# Altium PCB 0.PCB1.PcbDoc (part 3 of 12)
Units mm, origin at the board's own origin, x right, y up, seen from the top; angles counter-clockwise.
Board outline 77 x 72 mm, 6 copper layers (Top Layer, Layer 1, Layer 3, Layer 4, Layer 2, Bottom Layer), stack 1.538 mm thick; 570 components, 490 nets, 3331 pads, 1909 vias.
Unrouted connection lines stored in the file: 2.
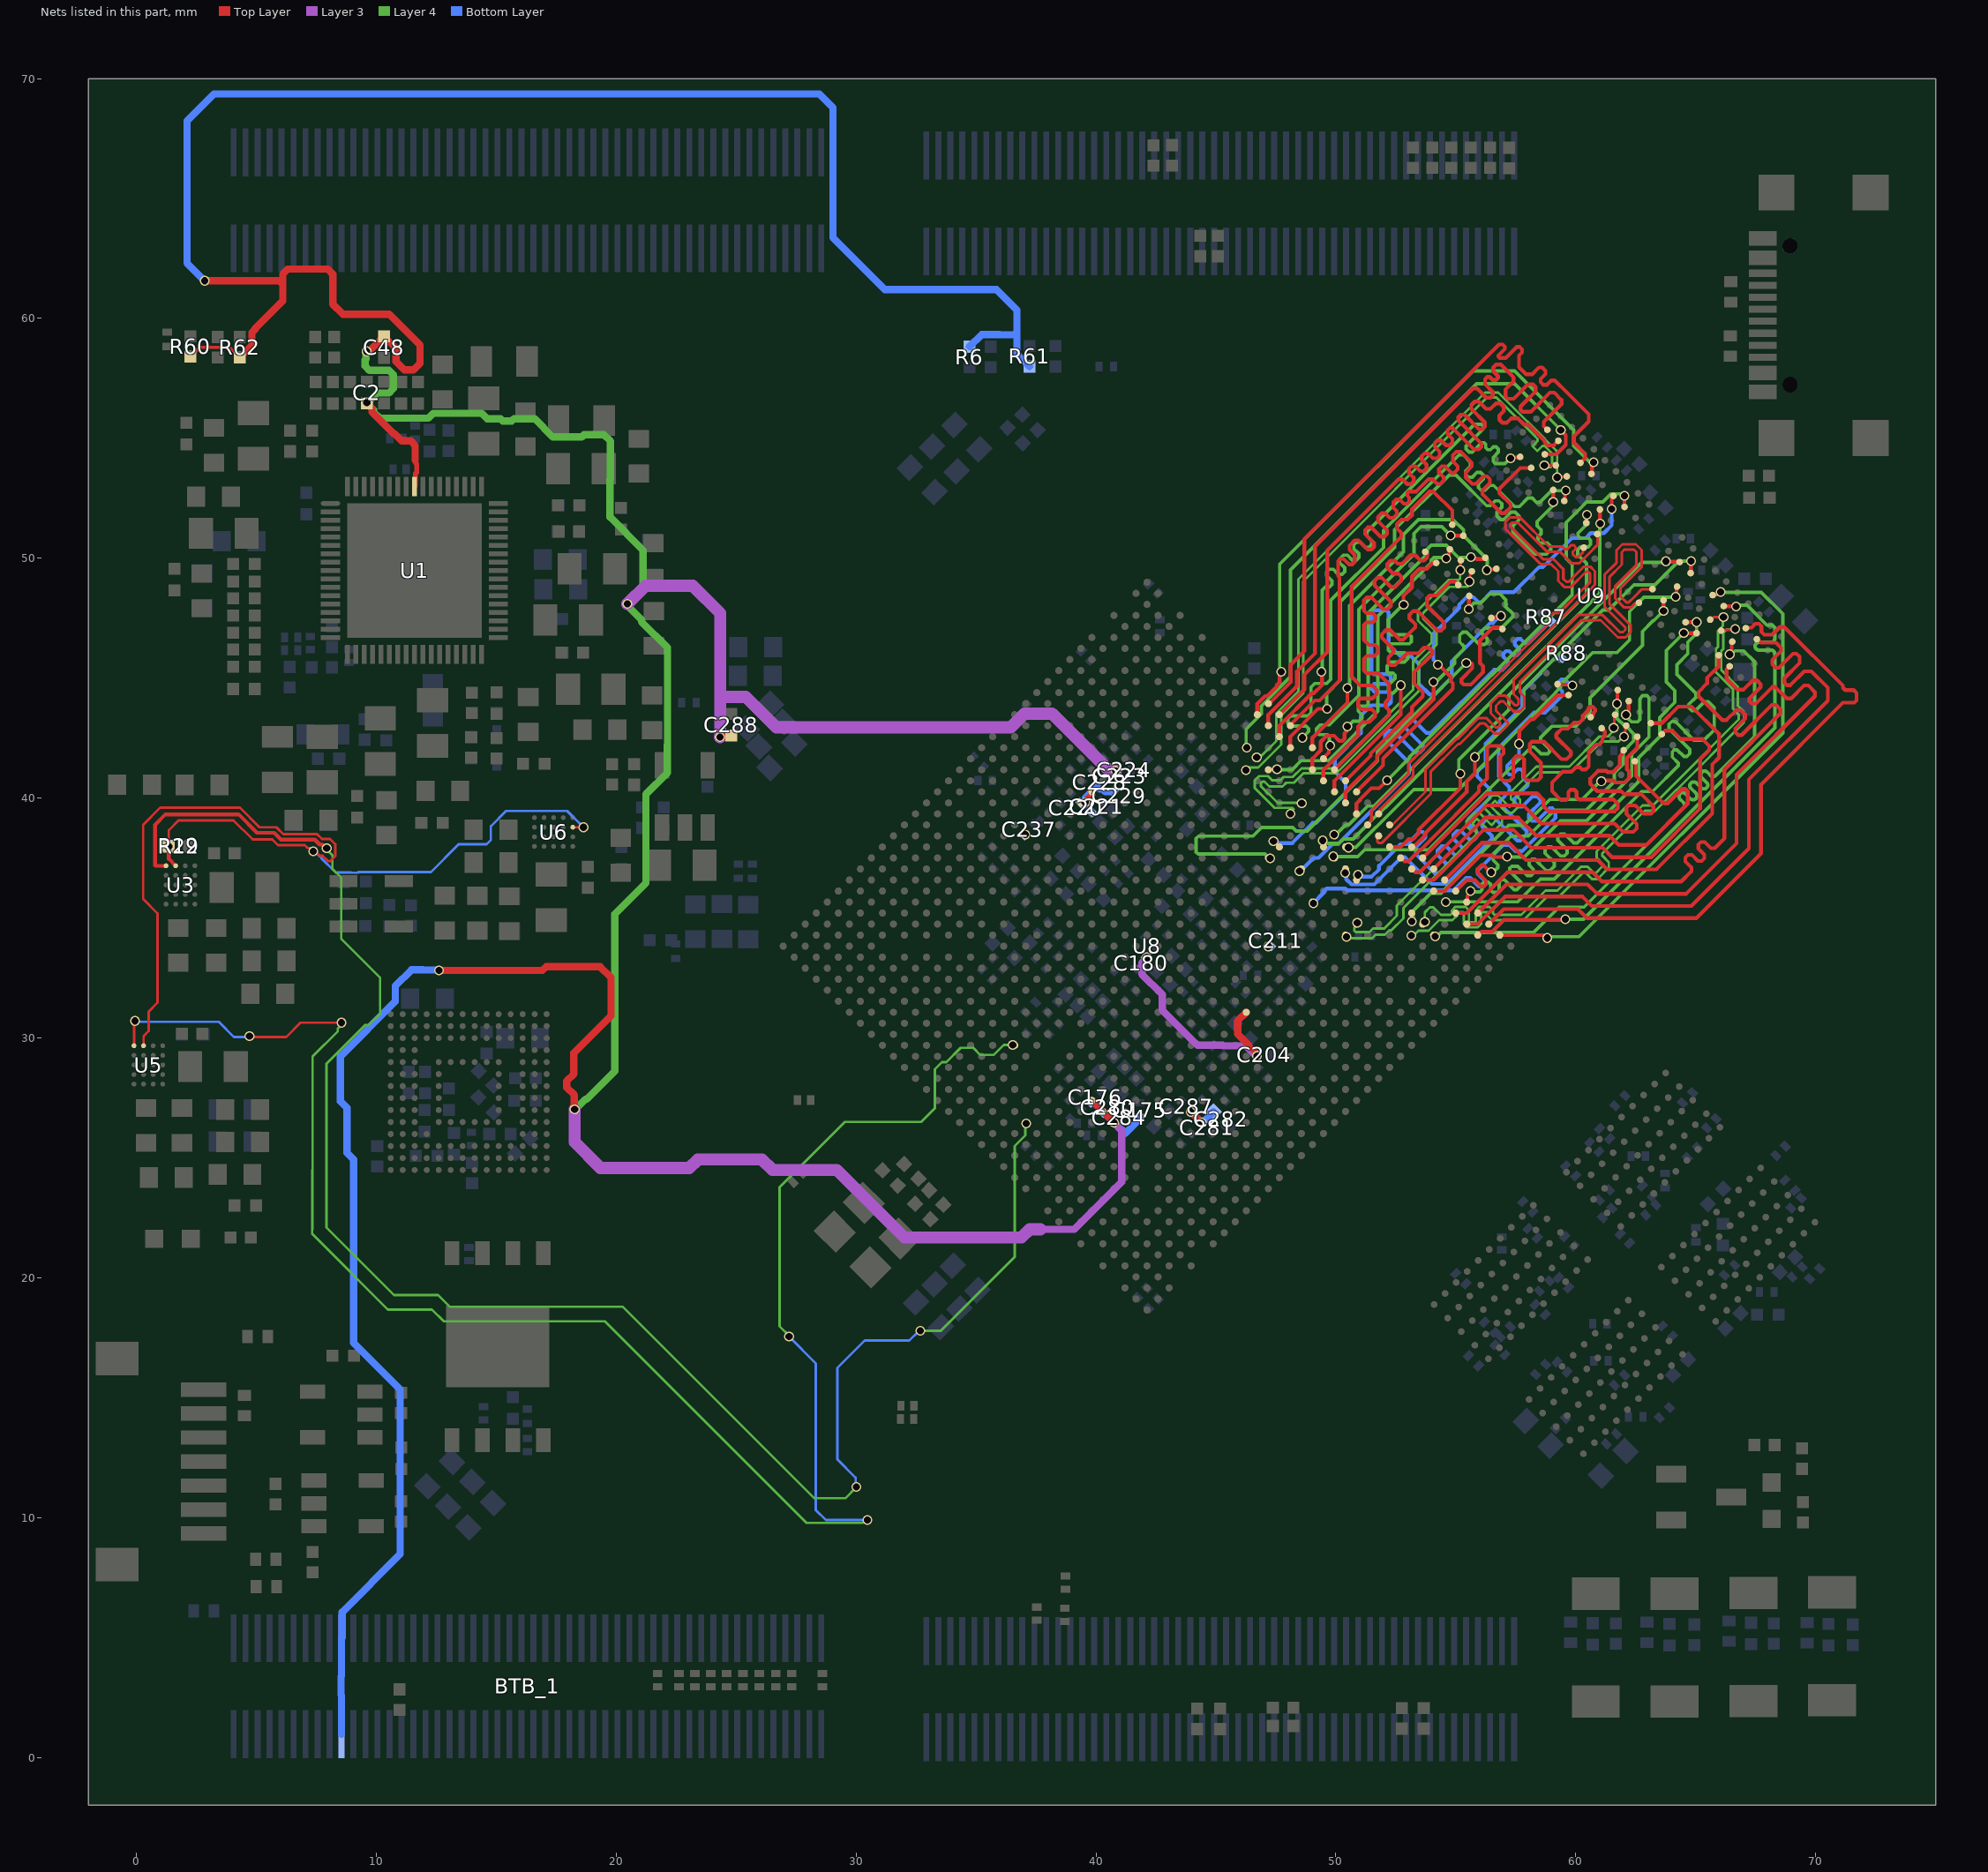
[diagram p7: the nets of this part, all layers, seen from the top]

## Via types
v1: diameter 0.41, hole 0.3, Top Layer to Bottom Layer, tented both sides, 1901 vias
v2: diameter 0.41, hole 0.3, Top Layer to Bottom Layer, 8 vias

## Nets (pads, with @x,y where several pads share a name; then routed paths per layer and width w, separated by ;. In a path a pad name is that pad's centre, name@x,y a point inside that pad or via, vN(x,y) a via of type N, cw(c..) or ccw(c..) an arc to the next point about the centre after c; other vN are vias at no path point) (continued)
AVDD1V8_DDR_PLL_S0: BTB_1.10 BTB_1.91 C2.2 C48.1 C175.2 C176.2 C180.2 C204.2 C211.2 C220.2 C221.2 C223.2 C224.2 C228.2 C229.2 C237.2 C280.2 C281.2 C282.2 C284.2 C287.2 C288.2 R6.2 R60.2 R61.2 R62.2 U1.60 U8.AG11 U8.AG13 U8.AG14 U8.AH18 U8.G23 U8.H23 U8.K16 U8.L27 U8.M12 U8.M27 U8.N27 U8.U18 | length 253.3
  Top Layer w0.127: R60.2@2.255,58.399 2.645,58.789 3.756,58.789 3.786,58.758 3.928,58.758 R62.2@4.312,58.374
  Top Layer w0.203: U1.60@11.59,52.989 11.637,53.036 11.637,53.523 11.681,53.567 11.681,53.933 11.624,53.99 11.624,54.086
  Top Layer w0.254: 46.382,29.671 46.635,29.418 46.635,29.367 46.713,29.29 v1(46.713,29.247)
  Top Layer w0.305: v1(2.849,61.567) 5.958,61.567 6.006,61.519 ; R62.2@4.312,58.374 4.353,58.333 4.353,58.414 4.625,58.687 4.635,58.687 4.816,58.869 4.816,59.407 4.951,59.542 4.951,59.579 6.1,60.728 6.1,61.857 6.298,62.055 7.98,62.055 8.191,61.844 8.191,60.592 8.607,60.175 10.538,60.175 11.82,58.894 11.82,58.121 11.551,57.852 11.171,57.852 10.824,58.198 10.824,58.742 10.341,59.226 C48.1@10.299,59.226 ; v1(9.595,58.628) 9.616,58.648 9.722,58.648 C48.1@10.32,59.246 ; C2.2@9.609,56.455 9.816,56.248 9.816,56.1 10.717,55.2 10.754,55.2 11.059,54.895 11.429,54.895 11.624,54.7 11.624,54.086 ; v1@12.636,32.813 16.924,32.813 17.081,32.97 19.334,32.97 19.788,32.515 19.788,30.922 18.236,29.37 18.236,28.499 17.937,28.199 17.937,27.936 18.252,27.62 18.252,27.041 v1(18.272,27.021) ; v1(24.329,42.542) 24.349,42.562 24.751,42.562 C288.2@24.792,42.603 ; v1(39.547,39.82) 39.547,39.848 39.832,40.133 U8.AG13@39.832,40.26 ; U8.N27@39.832,27.391 40.289,26.935 40.289,26.927 v1(40.748,26.467) ; v1(43.959,26.92) v1(44.418,26.46) ; U8.K16@46.267,31.068 45.912,30.713 45.912,30.165 46.382,29.695
  Layer 3 w0.305: 37.691,22.017 39.105,22.017 41.074,23.986 41.074,26.142 40.764,26.452 v1@40.764,26.457 ; v1(42.125,33.355) 42.125,33.326 41.919,33.12 41.919,32.655 42.763,31.811 42.763,31.158 44.174,29.746 44.186,29.746 44.239,29.693 45.277,29.693 45.299,29.671 46.261,29.671 46.684,29.247 v1(46.713,29.247)
  Layer 3 w0.508: v1(18.272,27.021) 18.272,25.649 19.349,24.572 23.045,24.572 23.403,24.93 26.083,24.93 26.519,24.494 29.195,24.494 32.012,21.677 36.895,21.677 37.234,22.017 37.691,22.017 ; v1(20.471,48.093) 21.23,48.852 23.192,48.852 24.34,47.704 24.34,44.222 ; v1(24.329,42.542) 24.34,42.553 24.34,44.222 ; v1(40.829,41.122) 40.572,41.122 38.173,43.521 37.015,43.521 36.446,42.952 26.675,42.952 25.405,44.222 24.34,44.222
  Layer 4 w0.305: v1(9.595,58.628) 9.575,58.608 9.575,58.304 9.537,58.266 9.537,58.013 9.716,57.835 10.53,57.835 10.708,57.656 10.708,57.07 10.53,56.891 10.04,56.891 9.638,56.489 v1(9.609,56.489) 9.609,56.46 9.882,56.187 9.882,56.106 10.151,55.837 12.168,55.837 12.374,56.043 14.39,56.043 14.62,55.814 15.175,55.814 15.268,55.721 15.648,55.721 15.741,55.814 16.607,55.814 17.363,55.058 18.565,55.058 18.652,55.146 19.493,55.146 19.762,54.877 19.762,53.305 19.742,53.284 19.742,51.712 21.117,50.337 21.117,48.739 v1@20.505,48.127 ; v1(18.272,27.021) 18.301,27.021 18.721,27.441 18.774,27.441 19.947,28.613 19.947,35.165 21.24,36.458 21.24,40.161 22.132,41.054 22.132,42.212 22.138,42.218 22.138,46.275 21.061,47.352 21.061,47.428 v1@20.434,48.055
  Bottom Layer w0.305: v1(2.849,61.567) 2.115,62.301 2.115,68.24 3.23,69.355 28.475,69.355 29.042,68.788 29.042,63.36 31.203,61.199 35.859,61.199 36.71,60.348 36.71,59.426 ; BTB_1.91@8.551,0.97 8.551,2.59 8.534,2.606 8.534,3.379 8.551,3.396 BTB_1.10@8.551,4.97 8.578,4.997 8.578,6.059 10.995,8.476 10.995,15.35 9.052,17.293 9.052,24.933 8.78,25.205 8.78,27.083 8.508,27.355 8.508,29.233 10.794,31.519 10.794,32.167 11.467,32.84 11.943,32.84 11.95,32.833 12.588,32.833 v1(12.608,32.813) ; R6.2@34.73,58.82 35.234,59.324 35.97,59.324 35.976,59.317 36.601,59.317 36.71,59.426 ; R61.2@37.231,57.993 36.885,58.339 36.875,58.339 36.71,58.504 36.71,59.426 ; C221.2@39.813,39.435 39.813,39.438 39.567,39.684 39.567,39.8 v1(39.547,39.82) 39.567,39.84 39.567,40.011 39.971,40.416 C228.2@39.971,40.419 ; C176.2@39.829,27.386 v1(40.748,26.467) ; C228.2@39.94,40.451 C228.2@39.971,40.419 ; C229.2@40.752,40.291 40.72,40.259 40.394,40.259 40.268,40.386 40.162,40.386 40.129,40.419 C228.2@39.971,40.419 ; C284.2@40.827,26.421 41.208,26.04 41.208,26.007 41.673,26.472 41.673,26.583 41.783,26.693 C175.2@41.828,26.693 ; v1(43.959,26.92) 43.963,26.924 43.965,26.924 44.422,26.467 C281.2@44.422,26.464 ; v1(44.418,26.46) C281.2@44.422,26.464 ; C282.2@44.901,26.922 44.472,26.492 44.45,26.492 C281.2@44.422,26.464
  other v1: 47.182,33.817 37.061,38.482
BIG/NPU_EN: R19.1 R22.2 U3.A2 U5.A2 U6.A2 | length 42.6
  Top Layer w0.102: U5.A2@0.299,29.671 0.299,30.079 0.489,30.27 0.508,30.288 0.508,31.093 0.884,31.469 0.884,31.51 0.884,35.192 0.284,35.792 0.284,38.885 0.998,39.599 4.317,39.599 5.136,38.78 5.838,38.78 6.121,38.497 7.53,38.497 7.733,38.294 8.076,38.294 8.291,38.079 8.291,37.583 8.076,37.367 7.992,37.367 7.764,37.595 7.645,37.595 7.459,37.781 7.459,37.868 v1(7.374,37.783) ; v1(1.353,37.982) 1.353,38.669 1.755,39.071 4.05,39.071 4.847,38.274 5.668,38.274 5.906,38.036 7.016,38.036 7.136,37.916 7.453,37.916 v1@7.48,37.889 ; U6.A2@18.193,38.784 v1(18.638,38.784)
  Top Layer w0.156: v1(1.353,37.982) 1.353,37.461 U3.A2@1.637,37.176
  Bottom Layer w0.102: v1(7.374,37.783) 7.438,37.783 7.659,37.562 7.714,37.562 7.714,37.49 8.311,36.893 8.947,36.893 8.948,36.891 9.233,36.891 9.26,36.918 12.277,36.918 13.431,38.072 14.599,38.072 14.777,38.25 14.777,38.834 15.405,39.463 17.959,39.463 18.469,38.953 v1(18.638,38.784)
CPU_BIG0_VSEL: U3.A1 U8.R31 | length 75.2
  Top Layer w0.156: U3.A1@1.237,37.176 0.799,37.176 0.78,37.195 0.78,38.884 1.215,39.319 4.259,39.319 5.029,38.55 5.742,38.55 6.025,38.267 7.434,38.267 7.637,38.063 7.732,38.063 7.886,37.91 v1(7.934,37.91)
  Layer 4 w0.102: v1(7.934,37.91) 7.934,37.847 8.173,37.608 8.173,37.044 8.544,36.673 8.544,34.126 10.162,32.508 10.162,31.02 9.674,30.532 9.534,30.532 7.926,28.923 7.926,22.091 10.736,19.28 12.576,19.28 13.062,18.794 20.271,18.794 28.262,10.804 29.557,10.804 30.019,11.266 v1(30.019,11.271) ; v1(32.682,17.79) 33.535,17.79 36.612,20.867 36.612,25.493 37.056,25.936 37.056,26.073 ; 37.056,26.073 37.056,26.388 v1(37.098,26.43)
  Bottom Layer w0.102: v1(30.019,11.271) 29.983,11.306 29.983,11.665 29.222,12.426 29.222,16.236 30.364,17.378 32.223,17.378 32.623,17.778 v1@32.707,17.778
CPU_BIG1_VSEL: U5.A1 U8.W28 | length 77.5
  Top Layer w0.102: U5.A1@-0.096,29.704 -0.098,29.707 -0.098,30.665 v1(-0.057,30.706) ; v1(4.717,30.07) 4.752,30.036 6.245,30.036 6.842,30.632 v1(8.549,30.632)
  Layer 4 w0.102: v1(8.549,30.632) 8.549,30.549 8.395,30.395 8.395,30.281 7.346,29.232 7.346,24.509 7.335,24.498 7.335,22.008 7.325,21.998 7.325,21.83 10.484,18.671 12.323,18.671 12.81,18.184 19.527,18.184 27.934,9.777 30.274,9.777 30.391,9.894 v1(30.475,9.894) ; v1(27.21,17.545) 27.21,17.579 26.812,17.977 26.812,23.772 29.537,26.498 32.72,26.498 33.288,27.066 33.288,28.693 33.585,28.989 33.766,28.989 34.362,29.585 34.889,29.585 35.187,29.288 35.733,29.288 36.153,29.708 36.523,29.708 v1(36.531,29.7)
  Bottom Layer w0.102: v1(-0.057,30.706) -0.021,30.671 3.431,30.671 4.066,30.036 4.683,30.036 v1(4.717,30.07) ; v1(27.21,17.545) 28.325,16.429 28.325,10.31 28.742,9.894 v1(30.475,9.894)
DDR_CH0_A0_A: U8.T7 U9.H2 | length 25.7
  Top Layer w0.156: v1@47.403,38.205 47.646,37.963 U8.T7@47.646,37.962 ; U9.H2@56.484,47.509 56.508,47.532 56.669,47.532 56.696,47.56 56.85,47.56 v1(56.885,47.594)
  Bottom Layer w0.156: v1(47.403,38.207) 47.487,38.123 48.19,38.123 49.029,38.962 49.179,38.962 50.412,40.195 50.412,40.638 49.963,41.087 49.963,41.625 51.04,42.703 51.04,43.422 51.489,43.871 52.175,43.871 52.293,43.988 52.293,44.326 52.201,44.417 51.617,44.417 51.508,44.527 51.508,44.663 51.6,44.755 52.156,44.755 52.293,44.892 52.293,45.07 52.201,45.162 51.581,45.162 51.489,45.253 51.489,47.737 51.581,47.829 52.112,47.829 52.204,47.737 52.204,46.404 52.676,45.931 52.887,45.931 ; 52.887,45.927 53.125,45.927 53.465,45.587 53.465,44.769 53.914,44.32 54.13,44.32 54.83,45.02 54.83,45.685 56.447,47.302 56.558,47.302 56.85,47.594 v1(56.885,47.594)
DDR_CH0_A0_B: U8.M8 U9.R2 | length 24
  Top Layer w0.156: v1(57.641,42.256) 57.65,42.266 57.65,42.806 58.13,43.285 58.24,43.285 59.246,44.291 U9.R2@59.701,44.291
  Bottom Layer w0.156: v1(49.061,35.61) 49.061,35.619 49.482,36.04 49.482,36.111 49.503,36.111 49.616,36.224 50.387,36.224 50.463,36.148 54.902,36.148 55.427,36.673 55.607,36.673 55.975,36.304 56.105,36.304 56.215,36.414 56.215,36.548 56.028,36.735 ; 56.024,36.731 55.909,36.846 55.909,36.976 56.967,38.033 57.239,38.033 57.487,37.785 57.766,37.785 59.158,39.177 59.158,39.449 59.039,39.568 58.909,39.568 58.391,39.05 58.173,39.05 58.054,39.17 58.054,39.335 58.518,39.8 58.518,39.929 58.391,40.056 58.196,40.056 57.773,39.633 57.643,39.633 57.452,39.825 57.446,39.825 57.446,39.97 57.802,40.325 57.802,40.336 57.997,40.531 57.997,40.66 57.906,40.752 57.894,40.752 57.802,40.844 57.802,41.107 57.71,41.199 57.581,41.199 57.36,40.978 57.231,40.978 57.139,41.07 57.139,41.341 57.54,41.743 57.561,41.743 57.635,41.816 57.635,42.246 v1@57.65,42.261
DDR_CH0_A1_A: U8.T8 U9.J2 | length 23.3
  Top Layer w0.156: v1(55.44,45.628) 55.46,45.607 55.673,45.607 55.691,45.59 55.691,45.41 55.237,44.957 55.237,44.827 55.329,44.736 55.63,44.736 56.14,45.246 56.14,45.5 56.014,45.626 56.014,46.577 56.552,47.116 56.876,47.116 U9.J2@56.944,47.049
  Layer 4 w0.142: v1(47.26,37.489) 47.217,37.489 47.041,37.665 44.256,37.665 44.172,37.748 44.172,38.311 44.277,38.415 46.547,38.415 46.905,38.773 48.203,38.773 48.351,38.626 48.805,38.626 51.734,41.555 51.734,41.922 v1(55.44,45.628)
DDR_CH0_A1_B: U8.M5 U9.P2 | length 21.5
  Top Layer w0.156: U9.P2@59.242,44.751 59.265,44.727 59.83,44.727 v1(59.859,44.698)
  Bottom Layer w0.156: v1(50.392,36.875) 50.44,36.827 50.44,36.613 50.657,36.396 51.606,36.396 52.75,37.541 52.88,37.541 54.004,36.417 54.632,36.417 56.505,38.29 56.505,38.419 56.104,38.82 56.104,38.95 56.409,39.255 56.538,39.255 57.562,38.231 57.692,38.231 57.957,38.497 57.957,38.637 56.841,39.753 56.841,39.882 57.237,40.278 57.237,40.458 56.788,40.907 56.788,42.092 58.26,43.565 58.727,43.565 59.444,44.282 59.444,44.454 59.268,44.631 59.268,44.811 59.4,44.943 59.546,44.943 59.791,44.698 v1(59.859,44.698)
DDR_CH0_A2_A: U8.P4 U9.H9 | length 19.5
  Top Layer w0.156: U9.H9@60.444,51.468 60.456,51.481 60.456,51.799 v1(60.469,51.812)
  Layer 4 w0.142: v1(49.928,38.482) 50,38.482 50.404,38.885 50.543,38.885 51.32,39.662 51.586,39.662 60.451,48.527 60.451,49.782 60.091,50.142 ; 60.08,50.142 60.08,50.358 60.192,50.47 60.522,50.47 60.624,50.572 60.624,50.747 60.541,50.831 60.202,50.831 60.091,50.942 60.091,51.04 60.424,51.373 60.424,51.767 v1(60.469,51.812)
DDR_CH0_A2_B: U8.N5 U9.R9 | length 20.3
  Top Layer w0.156: v1(63.662,47.801) U9.R9@63.661,48.251
  Layer 4 w0.142: v1(49.901,37.565) 50.917,37.565 51.195,37.844 53.862,37.844 54.119,38.1 58.148,42.13 58.266,42.13 58.556,41.839 58.828,41.839 58.911,41.923 58.911,42.041 58.544,42.408 58.544,42.526 58.983,42.965 59.012,42.994 60.008,42.994 60.599,43.584 60.599,44.179 62.785,46.366 62.785,46.947 63.235,47.396 63.256,47.396 v1(63.662,47.801)
DDR_CH0_A3_A: U8.P5 U9.H10 | length 19.4
  Top Layer w0.156: U9.H10@61.009,52.034 61.014,52.03 61.014,51.455 v1(61.018,51.451)
  Layer 4 w0.142: v1(49.45,38.23) 49.522,38.23 49.639,38.113 50.124,38.113 50.311,38.301 50.727,38.301 50.993,38.567 50.998,38.567 51.188,38.757 51.188,38.762 51.704,39.278 51.745,39.278 52.344,39.876 61.01,48.542 61.01,51.442 v1(61.018,51.451)
DDR_CH0_A3_B: U8.N4 U9.R10 | length 19.2
  Top Layer w0.156: v1(64.166,48.398) 64.203,48.435 64.203,48.793 U9.R10@64.227,48.817
  Layer 4 w0.142: v1(50.527,37.933) 50.537,37.943 50.834,37.943 52.555,39.664 53.252,40.361 55.122,40.361 58.897,44.136 59.373,44.612 59.373,44.732 60.705,46.064 61.723,46.064 62.247,46.587 62.247,47.774 62.841,48.368 64.136,48.368 v1(64.166,48.398)
DDR_CH0_A4_A: U8.R1 U9.H11 | length 19.4
  Top Layer w0.156: U8.R1@50.863,40.26 51.971,41.368 51.971,41.649 54.88,44.557 54.88,44.784 54.793,44.871 54.793,45.051 v1@54.326,45.518 ; v1(61.503,52.052) 61.503,52.494 61.575,52.566 U9.H11@61.575,52.6
  Bottom Layer w0.156: v1@54.325,45.515 54.073,45.766 54.073,46.854 54.583,47.364 54.69,47.471 55.147,47.927 55.147,48.062 55.455,48.37 55.744,48.37 55.941,48.173 56.07,48.173 56.483,48.586 57.421,48.586 58.463,49.628 58.635,49.628 59.847,50.84 60.412,50.84 60.624,51.052 61.177,51.052 61.503,51.377 v1(61.503,52.052)
  other v1: 54.259,45.555
DDR_CH0_A4_B: U8.K1 U9.R11 | length 18.3
  Top Layer w0.156: U8.K1@53.161,37.962 53.2,37.962 53.272,38.034 53.315,38.034 53.709,38.428 53.709,38.51 55.456,40.257 55.456,40.685 55.798,41.028 v1(55.798,41.705) ; U9.R11@64.793,49.382 64.804,49.394 64.804,49.872 v1(64.815,49.883)
  Layer 4 w0.142: v1(55.798,41.705) 57.849,43.756 57.849,44.544 61.138,47.834 61.373,47.834 62.43,48.89 63.299,48.89 64.292,49.883 v1(64.815,49.883)
DDR_CH0_A5_A: U8.P2 U9.J11 | length 19.6
  Top Layer w0.156: U8.P2@50.863,39.341 50.863,39.767 51.003,39.907 51.003,39.933 51.479,40.409 51.81,40.409 52.134,40.733 v1(52.134,40.745) ; U9.J11@62.035,52.14 v1(62.035,52.609)
  Layer 4 w0.142: v1(52.134,40.745) 52.146,40.745 53.083,41.682 53.083,41.709 59.856,48.483 59.856,49.733 59.6,49.989 59.6,51.49 60.22,52.11 60.222,52.11 60.454,52.342 61.129,52.342 61.475,52.688 61.873,52.688 61.952,52.609 v1(62.035,52.609)
DDR_CH0_A5_B: U8.L2 U9.P11 | length 18.3
  Top Layer w0.156: U8.L2@52.242,37.962 52.71,37.962 53.029,38.282 53.212,38.282 53.449,38.519 53.449,38.674 55.188,40.413 v1(55.188,41.019) ; v1(63.76,49.872) 63.775,49.857 64.318,49.857 U9.P11@64.333,49.842
  Layer 4 w0.142: v1(55.188,41.019) 55.13,41.078 55.13,41.599 57.218,43.687 57.218,44.293 57.436,44.511 62.753,49.828 63.716,49.828 v1(63.76,49.872)
DDR_CH0_CLKN_A: U8.N1 U9.J9 | length 24.1
  Top Layer w0.112: U8.N1@51.782,39.341 51.818,39.377 51.818,39.503 53.228,40.913 53.228,41.326 56.925,45.023 60.802,48.9 60.802,49.46 60.613,49.649 60.342,49.649 59.706,49.014 59.614,49.014 59.486,49.141 59.486,49.546 59.072,49.96 58.641,49.96 57.274,51.327 57.274,51.419 57.339,51.485 57.59,51.485 58.803,50.272 59.342,50.272 59.83,49.784 60.136,49.784 60.523,50.171 60.903,50.551 U9.J9@60.903,51.009
DDR_CH0_CLKN_B: U8.M1 U9.P9 | length 26
  Top Layer w0.112: U8.M1@52.242,38.881 52.278,38.917 52.397,38.917 53.741,40.262 53.741,41.192 55.013,42.465 55.074,42.465 55.947,43.338 56.273,43.338 56.662,42.949 56.755,42.949 56.839,43.033 56.839,43.157 56.463,43.533 56.463,43.95 56.79,44.276 57.062,44.276 57.467,43.871 57.561,43.871 57.627,43.937 57.627,44.115 57.413,44.328 57.413,44.928 60.116,47.63 61.127,47.63 61.836,46.922 61.975,46.922 62.069,47.016 62.069,47.115 61.201,47.983 61.201,49.313 61.707,49.82 61.707,50.339 61.945,50.577 62.511,50.577 62.749,50.339 62.749,49.632 61.869,48.752 61.869,48.403 62.116,48.156 62.209,48.156 62.439,48.387 62.763,48.711 U9.P9@63.202,48.711
DDR_CH0_CLKP_A: U8.N2 U9.J8 | length 24.6
  Top Layer w0.112: U8.N2@51.323,38.881 51.323,38.932 51.485,39.095 51.485,39.471 53.015,41.001 53.015,41.414 58.962,47.362 58.962,47.604 59.065,47.707 59.307,47.707 60.411,48.811 ; U9.J8@60.338,50.443 60.31,50.415 60.31,50.259 60.094,50.044 60.002,50.044 59.874,50.171 59.874,50.264 59.991,50.381 59.991,50.473 59.915,50.549 59.816,50.549 59.641,50.374 59.542,50.374 59.431,50.485 58.892,50.485 57.679,51.698 57.251,51.698 57.06,51.508 57.06,51.238 58.552,49.747 58.984,49.747 59.273,49.458 59.273,49.053 59.525,48.8 59.795,48.8 60.433,49.438 60.526,49.438 60.591,49.373 60.591,48.987 60.413,48.809
DDR_CH0_CLKP_B: U8.M2 U9.P8 | length 26.4
  Top Layer w0.112: U8.M2@51.729,38.339 51.727,38.337 51.727,38.183 51.787,38.123 51.904,38.123 53.954,40.173 53.954,41.104 55.102,42.252 55.162,42.252 56.03,43.119 56.19,43.119 56.616,42.693 56.819,42.693 57.175,43.049 57.175,43.142 56.679,43.638 56.679,43.848 56.859,44.028 56.996,44.028 57.404,43.62 57.674,43.62 57.864,43.81 57.864,44.218 57.667,44.416 57.667,44.846 60.228,47.407 60.769,47.407 60.778,47.417 61.039,47.417 61.757,46.698 62.074,46.698 62.285,46.909 62.285,47.216 62.018,47.483 ; 62.039,47.468 61.414,48.093 61.414,49.225 61.921,49.731 61.921,50.251 62.034,50.364 62.423,50.364 62.536,50.251 62.536,49.72 61.656,48.84 61.656,48.315 62.028,47.943 62.297,47.943 62.467,48.113 62.604,48.113 U9.P8@62.636,48.145
DDR_CH0_DM0_A: U8.Y4 U9.C3 | length 13.9
  Top Layer w0.156: U8.Y4@47.186,41.179 47.194,41.187 47.541,41.187 v1(47.549,41.195) ; v1(54.604,49.99) 54.604,50.069 54.728,50.194 54.728,50.349 U9.C3@54.752,50.372
  Layer 4 w0.142: v1(47.549,41.195) 47.565,41.178 48.179,41.178 48.559,41.559 49.683,41.559 49.904,41.779 51.75,43.625 51.75,47.586 53.984,49.819 53.984,49.92 54.094,50.03 54.563,50.03 v1(54.604,49.99)
DDR_CH0_DM0_B: U8.G4 U9.Y3 | length 14.1
  Top Layer w0.142: U8.G4@53.161,35.204 53.165,35.201 53.165,34.858 v1(53.168,34.855)
  Top Layer w0.156: v1(61.069,40.697) 61.101,40.729 61.572,40.729 61.65,40.651 62.031,40.651 62.231,40.851 62.231,41.1 62.138,41.192 62.138,41.674 62.565,42.101 U9.Y3@62.565,42.559
  Layer 4 w0.142: v1(53.168,34.855) 53.224,34.911 53.224,35.294 53.957,36.027 54.38,36.027 56.899,38.546 57.218,38.864 57.842,38.864 58.92,39.942 60.271,39.942 61.026,40.697 v1(61.069,40.697)
DDR_CH0_DM1_A: U8.AB4 U9.C10 | length 25.2
  Top Layer w0.156: U9.C10@58.711,54.332 59.193,54.332 59.589,54.728 59.589,55.135 59.379,55.344 v1(59.377,55.343)
  Layer 4 w0.142: v1(46.286,42.1) 46.265,42.122 46.265,42.881 46.89,43.507 46.89,43.839 47.988,44.937 48.117,45.066 48.117,49.52 55.871,57.274 57.451,57.274 59.337,55.388 59.373,55.388 59.377,55.384 v1(59.377,55.343)
DDR_CH0_DM1_B: U8.E4 U9.Y10 | length 24.2
  Top Layer w0.156: v1@66.503,46.144 66.503,46.497 U9.Y10@66.525,46.519
  Layer 4 w0.142: v1(54.147,34.224) 54.219,34.224 54.384,34.389 58.248,34.389 59.311,35.452 60.352,35.452 64.437,39.537 64.487,39.588 ccw(c64.374,39.701) 64.487,39.814 64.353,39.948 cw(c64.467,40.062) 64.353,40.175 cw(c64.467,40.062) 64.58,40.175 64.781,39.974 ccw(c64.894,40.087) 65.007,39.974 ccw(c64.894,40.087) 65.007,40.2 64.806,40.401 cw(c64.919,40.515) 64.806,40.628 cw(c64.919,40.515) 65.033,40.628 65.234,40.427 ccw(c65.347,40.54) 65.46,40.427 ccw(c65.347,40.54) 65.46,40.653 65.259,40.854 cw(c65.372,40.968) 65.259,41.081 cw(c65.372,40.968) 65.486,41.081 65.62,40.947 ccw(c65.733,41.06) 65.846,40.947 66.436,41.536 67.455,42.556 67.455,45.689 67.006,46.138 66.639,46.138 66.493,45.992 v1(66.42,45.992)
DDR_CH0_DQ0_A: U8.U1 U9.B2 | length 18
  Top Layer w0.156: U8.U1@49.944,41.179 52.224,43.459 52.224,43.668 52.071,43.821 52.071,44 52.224,44.153 52.224,44.744 51.769,45.2 51.297,45.2 51.17,45.327 51.17,45.804 51.297,45.931 51.627,45.931 51.772,46.076 51.772,46.256 51.645,46.383 51.387,46.383 51.17,46.6 51.17,47.218 51.281,47.329 51.538,47.329 51.649,47.441 51.649,47.599 51.538,47.711 51.281,47.711 51.17,47.822 51.17,48.24 51.297,48.367 51.476,48.367 51.971,47.872 52.151,47.872 52.293,48.014 52.293,48.194 51.612,48.875 51.612,49.055 51.739,49.182 51.919,49.182 52.296,48.805 52.476,48.805 52.726,49.055 52.726,49.234 52.598,49.361 52.386,49.361 52.152,49.595 52.152,49.775 52.278,49.9 52.458,49.9 52.586,49.772 52.766,49.772 53.125,50.131 53.304,50.131 53.535,49.9 53.678,49.9 53.805,50.027 53.805,50.188 U9.B2@53.726,50.266
DDR_CH0_DQ0_B: U8.H1 U9.AA2 | length 16.7
  Top Layer w0.156: U8.H1@54.08,37.043 56.22,39.183 57.607,39.183 58.359,38.431 61.412,38.431 61.802,38.041 62.942,38.041 64.676,39.775 64.676,40.269 64.562,40.382 64.433,40.382 63.826,39.776 63.696,39.776 63.644,39.828 ; U9.AA2@62.459,41.534 62.516,41.477 62.516,40.92 63.621,39.815 63.631,39.815
DDR_CH0_DQ1_A: U8.T2 U9.C2 | length 16.1
  Top Layer w0.156: U8.T2@49.944,40.26 49.944,40.718 52.709,43.483 v1@52.709,44.692 ; v1@52.817,48.104 52.817,48.427 53.176,48.787 53.176,49.249 53.486,49.559 53.793,49.559 54.017,49.783 54.162,49.783 U9.C2@54.186,49.807
  Layer 4 w0.142: 52.189,45.559 52.3,45.671 52.863,45.671 53.003,45.811 53.003,45.929 52.881,46.052 52.3,46.052 52.189,46.163 52.189,46.322 52.3,46.433 53.069,46.433 53.152,46.516 53.152,46.731 53.069,46.814 52.3,46.814 52.189,46.925 52.189,47.45 52.817,48.078 v1@52.817,48.114 ; 52.194,45.553 52.145,45.504 52.145,45.283 52.217,45.212 52.382,45.212 52.466,45.129 52.466,44.994 52.189,44.717 52.189,44.466 52.272,44.382 52.39,44.382 v1(52.709,44.701)
  other v1: 52.829,48.055
DDR_CH0_DQ1_B: U8.J2 U9.Y2 | length 19.1
  Top Layer w0.156: U8.J2@53.161,37.043 53.191,37.043 53.325,36.909 53.494,36.909 54.402,37.817 56.276,39.691 57.818,39.691 58.569,38.939 61.622,38.939 61.977,38.585 62.398,38.585 62.546,38.734 62.546,38.913 62.118,39.342 62.118,39.599 62.209,39.69 62.488,39.69 62.543,39.636 62.836,39.342 63.142,39.342 63.234,39.434 63.234,39.663 62.731,40.166 62.013,40.166 61.887,40.291 60.903,40.291 60.612,40.582 60.612,40.812 60.874,41.074 60.934,41.135 61.276,41.135 61.329,41.082 61.551,41.082 61.837,41.367 61.837,41.735 61.934,41.833 61.934,41.895 62,41.96 U9.Y2@61.999,41.993
DDR_CH0_DQ2_A: U8.T1 U9.E2 | length 18.5
  Top Layer w0.156: U8.T1@50.404,40.72 51.455,41.771 51.455,41.862 53.176,43.583 53.176,43.794 53.625,44.243 53.625,44.422 53.266,44.782 53.266,45.245 54.022,46.001 54.022,46.131 53.888,46.264 53.671,46.264 53.446,46.039 52.975,46.039 52.473,45.537 52.284,45.537 52.193,45.629 52.193,45.861 52.405,46.073 52.405,46.203 51.914,46.693 51.914,46.823 52.092,47.001 52.27,47.001 52.669,46.601 52.799,46.601 53.315,47.117 53.315,47.247 53.068,47.494 53.068,47.637 53.229,47.797 53.408,47.797 54.217,46.988 54.397,46.988 54.524,47.115 54.524,47.295 53.805,48.014 53.805,48.338 53.912,48.445 54.2,48.445 54.784,49.029 54.963,49.029 U9.E2@55.105,48.887
DDR_CH0_DQ2_B: U8.J1 U9.V2 | length 17.8
  Top Layer w0.156: U8.J1@53.621,37.502 56.317,40.199 58.387,40.199 58.654,39.932 58.654,39.665 58.871,39.448 61.631,39.448 61.758,39.575 61.758,39.754 61.571,39.942 60.129,39.942 60.037,40.033 60.037,40.252 59.946,40.343 59.786,40.343 59.694,40.252 59.694,40.011 59.603,39.919 59.386,39.919 59.013,40.291 59.013,40.651 59.462,41.1 59.821,41.1 60.001,41.279 60.181,41.279 60.271,41.189 60.413,41.189 60.54,41.317 60.54,41.921 60.848,42.229 60.99,42.229 61.117,42.356 61.117,42.498 61.216,42.597 61.216,42.777 U9.V2@61.08,42.912
DDR_CH0_DQ3_A: U8.R2 U9.F2 | length 16
  Top Layer w0.156: U8.R2@50.404,39.801 50.403,40.262 51.713,41.571 51.713,41.755 54.075,44.117 v1@54.075,44.835 ; v1(55.538,47.88) 55.551,47.894 55.551,48.415 U9.F2@55.565,48.428
  Layer 4 w0.142: v1(54.075,44.845) 54.182,44.845 54.951,45.614 54.951,45.823 55.34,46.212 55.34,46.331 55.166,46.505 55.166,46.785 55.308,46.927 55.455,46.927 55.978,46.404 56.215,46.404 56.309,46.498 56.309,46.647 56.091,46.865 56.091,46.974 56.211,47.094 56.253,47.094 ; v1(55.538,47.88) 55.538,47.902 55.768,48.132 56.039,48.132 56.416,48.509 56.841,48.509 57.092,48.258 57.092,47.97 57.374,47.688 57.374,47.564 56.901,47.09 56.88,47.09 ; 56.257,47.092 56.88,47.092
DDR_CH0_DQ3_B: U8.K2 U9.U2 | length 19.5
  Top Layer w0.156: U8.K2@52.702,37.502 52.732,37.502 52.865,37.369 53.035,37.369 53.489,37.822 53.516,37.822 53.957,38.263 55.964,40.27 55.964,40.475 56.306,40.817 56.306,42.084 56.398,42.176 56.858,42.176 56.992,42.042 56.992,41.862 56.858,41.728 56.858,40.85 56.985,40.723 57.252,40.723 57.397,40.868 57.397,41.62 57.523,41.746 57.719,41.746 57.846,41.619 57.846,40.868 57.973,40.74 58.419,40.74 58.546,40.868 58.546,41.477 58.092,41.931 58.092,42.256 58.183,42.347 58.682,42.347 59.408,41.62 59.624,41.62 59.803,41.799 59.803,41.927 59.193,42.536 59.193,42.662 59.426,42.896 59.683,42.896 59.932,43.145 60.164,43.145 60.291,43.272 60.291,43.444 60.305,43.444 60.536,43.675 60.536,43.749 60.591,43.804 60.709,43.804 60.809,43.703 60.809,43.631 60.737,43.559 60.737,43.488 U9.U2@60.621,43.372
DDR_CH0_DQ4_A: U8.W1 U9.F4 | length 15.9
  Top Layer w0.156: U8.W1@49.025,42.099 49.025,42.516 50.482,43.973 v1(50.482,44.584) ; v1(56.289,49.506) 56.318,49.536 56.673,49.536 U9.F4@56.696,49.559
  Layer 4 w0.142: v1@50.483,44.594 50.574,44.685 50.574,48.026 52.817,50.269 52.817,50.988 53.446,51.616 54.883,51.616 55.332,51.167 55.332,50.936 56.309,49.959 56.309,49.526 v1(56.289,49.506)
DDR_CH0_DQ4_B: U8.F1 U9.U4 | length 14.9
  Top Layer w0.156: U8.F1@55,36.123 55.45,36.574 55.798,36.574 56.052,36.32 56.172,36.32 56.255,36.403 56.255,36.548 55.9,36.904 55.9,37.031 56.077,37.209 56.154,37.209 56.408,36.955 v1@56.458,36.955 ; v1(61.724,43.932) 61.738,43.946 61.738,44.49 U9.U4@61.752,44.503
  Layer 4 w0.142: v1(56.484,36.904) 56.56,36.904 56.755,37.099 56.755,37.217 56.56,37.412 56.56,37.666 56.662,37.768 ; 56.661,37.769 57.308,38.415 58.026,38.415 59.104,39.493 60.427,39.493 61.615,40.681 61.615,41.057 61.977,41.42 61.977,41.936 62.426,42.385 62.426,42.674 62.104,42.996 62.051,42.996 61.727,43.32 61.727,43.929 v1(61.724,43.932)
DDR_CH0_DQ5_A: U8.V2 U9.E4 | length 15.1
  Top Layer w0.156: U8.V2@49.025,41.18 49.025,41.647 49.37,41.992 49.37,42.351 49.613,42.594 49.931,42.594 50.141,42.383 50.271,42.383 50.362,42.475 50.362,42.695 50.433,42.766 50.433,42.932 v1(50.489,42.988) ; v1(55.632,50.047) 55.68,49.998 55.823,49.998 55.862,49.96 56.144,49.96 56.203,50.019 U9.E4@56.237,50.019
  Layer 4 w0.142: v1@50.515,43.076 50.599,43.076 50.726,43.203 50.972,43.203 51.099,43.33 51.099,43.457 50.933,43.624 50.933,43.742 51.016,43.825 51.261,43.825 51.344,43.909 51.344,47.704 53.812,50.172 53.812,50.372 53.977,50.537 54.604,50.537 55.166,49.976 55.213,50.023 55.608,50.023 v1(55.632,50.047)
DDR_CH0_DQ5_B: U8.G2 U9.V4 | length 16.6
  Top Layer w0.156: U8.G2@54.08,36.124 54.535,36.124 56.027,37.615 56.508,37.615 56.584,37.539 57.128,37.539 v1(57.144,37.556) ; v1(62.097,43.47) 62.097,43.539 62.212,43.653 U9.V4@62.212,44.044
  Layer 4 w0.142: v1(57.144,37.556) 57.161,37.539 57.868,37.539 57.936,37.607 59.373,39.044 60.451,39.044 62.336,40.93 62.336,41.828 63.055,42.546 63.055,44.187 62.971,44.27 62.79,44.27 62.707,44.187 62.707,44.143 62.681,44.118 62.681,43.279 62.58,43.178 62.327,43.178 62.206,43.299 62.206,43.319 62.097,43.428 v1(62.097,43.47)
DDR_CH0_DQ6_A: U8.V1 U9.C4 | length 14.2
  Top Layer w0.156: U8.V1@49.484,41.639 49.484,41.678 49.708,41.902 49.708,42.131 v1(49.764,42.187) ; v1(54.789,50.947) 54.793,50.942 55.313,50.942 U9.C4@55.317,50.938
  Layer 4 w0.142: v1@49.746,42.205 v1(49.764,42.187) ; v1@49.778,42.238 49.727,42.289 49.727,42.569 49.651,42.644 49.296,42.644 49.194,42.746 49.194,42.898 49.346,43.051 49.73,43.051 50.186,43.507 50.952,44.273 50.955,44.276 50.955,47.868 53.266,50.18 53.266,51.032 53.547,51.312 54.423,51.312 v1(54.789,50.947)
DDR_CH0_DQ6_B: U8.G1 U9.Y4 | length 20.3
  Top Layer w0.156: U8.G1@54.54,36.583 56.093,38.136 57.217,38.136 57.938,37.415 60.92,37.415 61.31,37.025 63.362,37.025 65.692,39.355 65.692,41.402 65.976,41.686 65.976,42.668 ; U9.Y4@63.131,43.124 63.589,43.124 64.277,43.813 64.831,43.813 65.928,42.716 65.976,42.668 ; 65.933,42.721 65.976,42.677 65.976,42.668
DDR_CH0_DQ7_A: U8.U2 U9.B4 | length 18.5
  Top Layer w0.156: U8.U2@49.484,40.72 49.484,41.172 50.266,41.953 50.931,42.618 50.931,42.985 51.111,43.165 51.397,43.165 51.629,43.397 51.629,43.577 51.501,43.704 51.058,43.704 50.931,43.831 50.931,44.063 51.021,44.153 51.522,44.153 51.702,44.333 51.702,44.512 51.522,44.692 51.021,44.692 50.661,45.051 50.661,48.822 52.727,50.888 52.727,51.068 52.547,51.247 52.547,51.427 52.727,51.607 52.985,51.607 53.176,51.797 53.176,52.056 53.895,52.774 54.074,52.774 54.858,51.99 U9.B4@54.858,51.398
DDR_CH0_DQ7_B: U8.H2 U9.AA4 | length 18.8
  Top Layer w0.156: U8.H2@53.621,36.583 54.08,36.583 54.858,37.361 56.172,38.675 57.397,38.675 58.148,37.923 61.13,37.923 61.52,37.533 63.152,37.533 65.184,39.565 65.184,41.612 65.569,41.997 65.569,42.177 65.29,42.456 64.392,42.456 64.042,42.806 63.731,42.806 U9.AA4@63.59,42.665
DDR_CH0_DQ8_A: U8.AB2 U9.B11 | length 29.3
  Top Layer w0.156: U8.AB2@47.186,43.018 47.186,43.474 48.327,44.615 48.382,44.67 48.382,45.285 49.135,46.039 49.135,50.5 55.717,57.082 55.884,57.082 56.268,56.698 56.451,56.698 56.542,56.79 56.542,56.937 56.22,57.26 56.22,57.47 56.311,57.562 56.413,57.562 56.544,57.43 56.674,57.43 56.766,57.522 56.766,57.599 56.564,57.801 56.564,57.958 56.678,58.072 56.884,58.072 57.41,57.546 57.41,57.367 57.074,57.031 57.074,56.744 57.165,56.653 57.414,56.653 58.014,57.252 58.217,57.252 58.332,57.137 58.332,56.957 57.7,56.325 57.7,56.205 57.7,56.196 57.792,56.104 58.122,56.104 58.923,56.905 59.103,56.905 59.408,56.6 59.408,56.42 58.671,55.683 58.671,55.503 U9.B11@58.817,55.357
DDR_CH0_DQ8_B: U8.D2 U9.AA11 | length 28.7
  Top Layer w0.156: U8.D2@55.459,34.745 55.914,34.745 57.06,35.891 60.289,35.891 60.679,35.501 64.82,35.501 67.216,37.897 67.216,40.771 70.508,44.063 70.508,44.602 69.824,45.286 69.527,45.286 68.948,44.707 68.8,44.707 68.699,44.808 68.699,44.996 69.334,45.631 69.334,45.898 69.209,46.023 69.059,46.023 68.47,45.433 68.34,45.433 68.191,45.583 68.191,45.756 68.565,46.131 68.565,46.26 68.351,46.475 67.734,46.475 67.607,46.601 U9.AA11@67.537,46.601
DDR_CH0_DQ9_A: U8.AB1 U9.C11 | length 29.3
  Top Layer w0.156: U8.AB1@47.646,43.478 48.686,44.518 48.686,45.13 49.645,46.089 49.645,50.321 52.619,53.294 52.776,53.294 52.978,53.093 53.136,53.093 53.247,53.204 53.247,53.362 53.046,53.564 53.046,53.721 53.158,53.833 53.315,53.833 53.517,53.632 53.675,53.632 53.786,53.743 53.786,53.901 53.585,54.102 53.585,54.26 53.696,54.372 53.854,54.372 54.056,54.17 54.213,54.17 54.325,54.282 54.325,54.44 54.124,54.641 54.124,54.799 54.235,54.911 54.393,54.911 54.594,54.709 54.752,54.709 54.864,54.821 54.864,54.979 54.662,55.18 54.662,55.338 54.747,55.422 54.877,55.422 55.765,54.534 55.958,54.534 56.072,54.648 56.072,54.778 55.181,55.67 ; 55.178,55.672 55.112,55.738 55.112,55.893 55.204,55.984 55.369,55.984 55.968,55.385 56.109,55.385 56.211,55.487 56.211,55.666 55.656,56.221 55.656,56.401 55.783,56.528 55.962,56.528 56.267,56.224 56.446,56.224 56.678,56.456 56.858,56.456 57.002,56.312 57.002,56.133 56.822,55.953 56.822,55.773 56.948,55.648 57.127,55.648 57.307,55.827 57.599,55.827 57.85,55.576 58.02,55.576 58.705,54.891 58.705,54.825 58.832,54.698 59.077,54.698 U9.C11@59.277,54.898
DDR_CH0_DQ9_B: U8.C1 U9.Y11 | length 27.8
  Top Layer w0.156: U8.C1@56.379,34.745 57.004,35.37 60.091,35.37 60.468,34.993 65.03,34.993 67.724,37.687 67.724,40.561 71.137,43.973 71.614,43.973 71.706,44.065 71.706,44.384 71.589,44.501 71.239,44.501 71.147,44.593 71.147,44.615 ; U9.Y11@67.091,47.084 67.114,47.108 67.33,47.108 67.49,47.267 67.639,47.267 67.741,47.166 67.741,46.932 67.865,46.808 68.188,46.808 68.514,47.134 68.694,47.134 71.137,44.692
DDR_CH0_DQ10_A: U8.AC1 U9.E11 | length 29.1
  Top Layer w0.156: U8.AC1@47.186,43.937 47.222,43.937 48.124,44.838 48.124,45.566 48.686,46.128 48.686,50.798 56.801,58.913 56.956,58.913 57.053,58.817 57.053,58.73 56.778,58.456 56.778,58.408 56.839,58.347 57.078,58.347 57.539,58.808 57.669,58.808 57.766,58.71 57.766,58.58 57.634,58.448 57.634,57.966 57.929,57.671 58.188,57.671 58.45,57.933 58.455,57.933 58.474,57.952 58.603,57.952 58.742,57.813 58.742,57.679 58.537,57.474 58.537,57.345 58.653,57.229 58.803,57.229 58.991,57.417 59.12,57.417 59.346,57.191 ; 59.351,57.196 60.54,56.007 60.54,55.702 59.911,55.073 59.911,54.839 60.394,54.356 60.394,54.177 U9.E11@60.196,53.979
DDR_CH0_DQ10_B: U8.C2 U9.V11 | length 24
  Top Layer w0.156: U8.C2@55.919,34.285 55.938,34.285 56.082,34.429 56.242,34.429 56.246,34.425 56.519,34.425 57.016,34.921 v1@59.57,34.921 ; U9.V11@66.171,48.004 66.178,47.996 66.674,47.996 v1(66.681,47.989)
  Layer 4 w0.142: v1(59.572,34.948) 60.327,34.948 68.301,42.923 68.301,45.939 68.301,46.01 ccw(c68.141,46.01) 68.141,46.17 67.639,46.17 cw(c67.639,46.331) 67.639,46.491 68.141,46.491 ccw(c68.141,46.651) 68.301,46.651 68.301,47.079 68.301,47.108 68.193,47.216 67.965,47.216 67.145,48.036 66.728,48.036 v1(66.681,47.989)
DDR_CH0_DQ11_A: U8.AC2 U9.F11 | length 25.7
  Top Layer w0.156: U8.AC2@46.727,43.477 46.727,43.929 47.054,44.257 47.146,44.257 47.554,44.665 47.554,44.727 47.663,44.836 47.663,45.213 v1(47.719,45.27) ; U9.F11@60.656,53.519 60.68,53.543 60.68,53.847 60.751,53.919 v1(60.751,53.998)
  Layer 4 w0.142: v1(47.719,45.27) 47.66,45.328 47.66,49.746 55.727,57.813 57.451,57.813 59.532,55.732 59.536,55.732 59.702,55.567 59.705,55.567 59.767,55.505 59.767,55.497 59.912,55.352 59.912,54.681 60.656,53.937 60.718,53.998 v1(60.751,53.998)
DDR_CH0_DQ11_B: U8.B1 U9.U11 | length 23.7
  Top Layer w0.156: U8.B1@56.838,34.285 58.755,34.285 v1@58.844,34.195 ; U9.U11@65.712,48.463 65.735,48.487 65.877,48.487 65.978,48.588 v1(66.047,48.588)
  Layer 4 w0.142: v1@58.847,34.222 60.14,34.222 68.63,42.712 68.63,47.683 67.733,48.58 67.693,48.58 66.055,48.58 v1(66.047,48.588)
  other v1: 58.815,34.167
DDR_CH0_DQ12_A: U8.Y1 U9.F9 | length 24
  Top Layer w0.156: U9.F9@59.525,52.388 59.548,52.411 59.548,52.795 v1(59.583,52.83)
  Layer 4 w0.142: v1(48.61,42.513) 48.871,42.773 48.871,42.891 48.762,43 48.127,43 48,43.127 48,43.305 48.127,43.432 48.838,43.432 48.965,43.559 48.965,44.626 49.118,44.778 49.626,44.778 49.791,44.943 49.791,48.244 51.989,50.442 51.989,51.161 55.132,54.304 55.311,54.304 55.614,54.001 55.614,53.843 55.412,53.642 55.412,53.484 55.524,53.372 55.682,53.372 55.883,53.574 56.041,53.574 56.153,53.462 56.153,53.305 55.951,53.103 55.951,52.945 56.063,52.834 56.221,52.834 56.422,53.035 56.58,53.035 57.461,52.154 57.652,52.154 58.005,52.508 58.185,52.508 58.365,52.328 58.498,52.328 58.983,52.813 59.566,52.813 v1(59.583,52.83)
DDR_CH0_DQ12_B: U8.F2 U9.U9 | length 24.8
  Top Layer w0.156: U9.U9@64.58,47.332 64.582,47.333 65.039,47.333 v1(65.041,47.334)
  Layer 4 w0.142: v1(54.579,35.659) 54.593,35.674 57.583,35.674 58.529,36.619 59.103,36.619 62.754,40.27 63.203,40.27 64.273,41.341 64.273,41.459 64.028,41.705 64.028,41.928 64.111,42.011 64.229,42.011 64.51,41.73 64.637,41.73 64.759,41.852 64.759,42.025 63.898,42.886 63.898,43.084 64.01,43.196 64.144,43.196 64.924,42.416 65.348,42.416 65.775,42.843 65.775,42.868 65.775,43.777 65.539,44.014 65.359,44.014 64.989,43.644 64.846,43.644 64.72,43.77 64.72,43.913 65.011,44.204 65.011,44.362 64.222,45.151 64.222,45.564 64.671,46.013 64.671,46.498 65.04,46.867 v1(65.041,47.334)
DDR_CH0_DQ13_A: U8.Y2 U9.E9 | length 25.1
  Top Layer w0.156: U8.Y2@48.105,42.099 48.105,42.566 49.256,43.716 v1(49.638,43.716) ; v1(59.066,52.347) U9.E9@59.065,52.847
  Layer 4 w0.142: v1@49.639,43.726 49.621,43.744 49.621,44.352 50.192,44.923 50.192,48.183 52.458,50.449 52.458,51.198 54.725,53.465 55.01,53.465 56.285,52.19 56.443,52.19 56.644,52.391 56.802,52.391 56.914,52.279 56.914,52.122 56.712,51.92 56.712,51.763 56.869,51.606 56.987,51.606 57.093,51.712 57.302,51.92 57.474,51.92 57.632,51.763 57.632,51.603 57.386,51.357 57.386,51.089 58.307,50.168 58.78,50.168 58.968,50.356 58.968,50.488 58.816,50.64 58.493,50.64 58.432,50.701 58.432,50.894 58.554,51.016 58.554,51.178 ; 58.554,51.189 58.554,51.178 ; v1(59.066,52.347) 59.066,52.207 58.385,51.527 58.385,51.347 58.554,51.178
DDR_CH0_DQ13_B: U8.E1 U9.V9 | length 23
  Top Layer w0.156: U8.E1@55.459,35.664 55.487,35.691 55.487,35.917 ; v1(64.507,46.881) 64.512,46.877 65.035,46.877 U9.V9@65.04,46.872
  Layer 4 w0.142: v1@55.671,36.091 56.012,36.091 56.096,36.175 56.096,36.414 56.179,36.498 56.357,36.498 56.458,36.396 56.458,36.149 56.542,36.066 56.731,36.066 56.814,36.149 56.814,36.498 56.907,36.591 57.025,36.591 57.347,36.269 57.347,36.262 57.431,36.178 57.549,36.178 57.71,36.339 57.71,36.497 57.25,36.956 57.25,37.075 57.333,37.158 57.587,37.158 57.979,36.766 58.137,36.766 58.236,36.866 58.236,37.031 58.059,37.209 58.059,37.336 58.177,37.455 58.295,37.455 58.77,36.98 58.926,36.98 59.104,37.158 59.104,37.316 58.722,37.697 58.722,37.855 58.834,37.966 58.992,37.966 59.373,37.585 59.531,37.585 59.642,37.697 59.642,37.855 59.261,38.236 59.261,38.394 59.373,38.505 59.531,38.505 59.912,38.124 60.07,38.124 62.626,40.681 62.626,41.683 63.504,42.561 63.504,43.355 64.136,43.986 64.136,44.483 63.781,44.837 63.781,46.155 v1(64.507,46.881)
  other v1: 55.62,36.129
DDR_CH0_DQ14_A: U8.AA1 U9.C9 | length 28.7
  Top Layer w0.156: U8.AA1@48.105,43.018 48.105,43.054 49.125,44.073 49.325,44.073 50.153,44.902 50.153,49.212 50.101,49.265 50.101,49.885 50.192,49.977 50.322,49.977 50.555,49.744 50.685,49.744 50.787,49.846 50.787,50.134 50.572,50.349 50.572,50.529 50.789,50.746 50.947,50.746 51.328,50.365 51.486,50.365 51.597,50.477 51.597,50.634 51.216,51.016 51.216,51.173 51.328,51.285 51.486,51.285 51.867,50.904 52.024,50.904 52.136,51.016 52.136,51.173 51.755,51.554 51.755,51.715 51.922,51.882 52.052,51.882 52.247,51.687 52.394,51.687 52.543,51.835 52.543,51.965 52.397,52.111 52.397,52.335 52.52,52.458 52.65,52.458 52.838,52.27 52.967,52.27 53.062,52.365 53.062,52.53 52.988,52.605 52.988,52.735 53.034,52.782 53.352,52.782 53.871,53.3 ; 53.877,53.295 54.034,53.295 54.228,53.101 54.358,53.101 54.498,53.24 54.498,53.37 54.304,53.564 54.304,53.722 54.415,53.833 54.548,53.833 54.828,53.554 54.929,53.554 55.082,53.706 55.082,53.836 54.876,54.041 54.876,54.173 54.884,54.181 54.884,54.298 55.026,54.44 ; 55.026,54.444 55.206,54.444 55.673,53.977 55.673,53.834 55.421,53.582 55.421,53.367 55.688,53.099 55.846,53.099 56.155,53.409 56.313,53.409 56.425,53.297 56.425,53.139 56.116,52.83 56.116,52.672 56.908,51.879 57.038,51.879 57.286,52.127 57.286,52.257 56.822,52.72 56.822,52.9 57.689,53.766 U9.C9@58.146,53.766
DDR_CH0_DQ14_B: U8.E2 U9.Y9 | length 29.1
  Top Layer w0.156: U8.E2@55,35.204 55.458,35.204 57.161,36.907 60.709,36.907 61.099,36.517 64.399,36.517 64.828,36.946 64.828,37.104 64.572,37.359 64.572,37.517 64.684,37.628 64.842,37.628 65.097,37.373 65.255,37.373 65.366,37.485 65.366,37.642 65.111,37.898 65.111,38.055 65.223,38.167 65.38,38.167 65.636,37.912 65.794,37.912 66.2,38.318 66.2,41.192 68.532,43.524 68.532,43.704 68.353,43.883 68.173,43.883 66.916,42.626 66.774,42.626 66.646,42.753 66.646,42.896 67.06,43.309 67.06,43.488 66.88,43.668 66.7,43.668 66.287,43.255 66.108,43.255 65.12,44.243 65.12,44.422 65.479,44.782 65.479,45.01 65.959,45.49 U9.Y9@65.959,45.953
DDR_CH0_DQ15_A: U8.AA2 U9.B9 | length 24.4
  Top Layer w0.156: U8.AA2@47.646,42.558 47.646,43.018 49.003,44.375 49.088,44.375 49.429,44.716 49.429,45.229 v1(49.393,45.265) ; v1(57.29,54.167) 57.325,54.202 57.662,54.202 U9.B9@57.686,54.226
  Layer 4 w0.142: v1(49.393,45.265) 49.43,45.302 49.43,48.664 49.557,48.791 49.722,48.791 49.834,48.902 49.834,49.06 49.623,49.271 49.623,49.428 49.735,49.54 49.893,49.54 50.103,49.329 50.261,49.329 50.373,49.441 50.373,49.599 50.162,49.809 50.162,49.967 50.324,50.129 50.482,50.129 50.692,49.918 50.85,49.918 50.962,50.03 50.962,50.188 50.751,50.398 50.751,50.556 50.863,50.668 51.02,50.668 51.231,50.457 51.389,50.457 51.5,50.569 51.5,50.726 51.29,50.937 51.29,51.095 55.026,54.831 55.778,55.583 56.057,55.583 56.14,55.5 56.14,55.382 55.436,54.678 55.436,54.56 55.566,54.43 55.696,54.43 56.076,54.809 56.194,54.809 56.249,54.754 56.249,54.607 56.333,54.524 56.451,54.524 56.57,54.643 56.688,54.643 56.771,54.56 56.771,54.419 56.56,54.208 56.56,54.035 56.643,53.951 57.053,53.951 57.268,54.167 v1(57.29,54.167)
DDR_CH0_DQ15_B: U8.D1 U9.AA9 | length 26.9
  Top Layer w0.156: U8.D1@55.919,35.204 57.113,36.399 60.499,36.399 60.889,36.009 64.609,36.009 66.708,38.108 66.708,40.981 69.969,44.243 69.969,44.422 69.7,44.692 69.52,44.692 68.981,44.153 68.802,44.153 68.328,44.627 68.198,44.627 67.511,43.94 67.338,43.94 67.246,44.031 67.246,44.161 67.709,44.624 67.709,44.754 67.558,44.905 67.38,44.905 66.999,44.524 66.745,44.524 66.288,44.981 66.288,45.007 ; 66.287,45.009 66.287,45.362 U9.AA9@66.419,45.493
DDR_CH0_DQS0N_A: U8.U4 U9.E3 | length 17.1
  Top Layer w0.112: v1(55.569,49.029) 55.598,49.057 55.598,49.334 55.671,49.408 U9.E3@55.671,49.453
  Layer 4 w0.105: v1@48.584,39.762 48.549,39.797 47.571,39.797 46.878,40.49 46.878,40.623 46.941,40.686 47.028,40.686 47.226,40.488 47.784,40.488 47.934,40.638 48.257,40.638 48.656,41.037 50.03,41.037 53.458,44.465 53.458,45.656 54.194,46.391 54.194,46.928 53.638,47.484 53.638,47.716 53.935,48.013 54.726,48.804 55.491,48.804 v1@55.521,48.834
  other v1: 48.582,39.784
DDR_CH0_DQS0N_B: U8.J7 U9.V3 | length 18.4
  Top Layer w0.112: v1(61.58,42.935) 61.614,42.969 61.614,43.446 U9.V3@61.646,43.478
  Layer 4 w0.105: v1@50.829,34.761 50.829,34.642 50.769,34.582 50.769,34.479 50.83,34.417 51.406,34.417 51.552,34.563 52.017,34.563 52.548,35.095 52.548,35.523 54.622,37.597 54.635,37.597 55.523,38.485 55.611,38.573 55.611,38.66 55.451,38.82 55.451,39.045 55.775,39.37 56,39.37 56.485,38.885 56.505,38.885 56.685,39.065 56.685,39.085 56.2,39.57 56.2,39.795 56.525,40.12 56.75,40.12 57.235,39.635 57.255,39.635 57.435,39.814 57.435,39.834 57.299,39.97 57.299,40.261 57.485,40.447 58.35,41.313 59.737,41.313 60.996,42.572 61.349,42.572 61.522,42.745 61.522,42.877 v1(61.58,42.935)
  other v1: 50.895,34.801
DDR_CH0_DQS0P_A: U8.U5 U9.D3 | length 17.5
  Top Layer w0.112: v1(55.188,49.502) 55.188,49.89 U9.D3@55.211,49.913
  Layer 4 w0.105: 48.234,39.535 48.179,39.59 47.453,39.59 46.624,40.419 46.624,40.739 46.801,40.917 47.167,40.917 47.345,40.739 47.688,40.739 47.827,40.879 48.203,40.879 48.567,41.243 49.944,41.243 53.23,44.529 53.23,45.719 53.988,46.477 53.988,46.842 53.431,47.399 53.431,47.83 54.693,49.091 55.119,49.091 55.181,49.153 v1@55.181,49.495
  other v1: 48.115,39.339
DDR_CH0_DQS0P_B: U8.J8 U9.W3 | length 18.7
  Top Layer w0.112: v1(62.02,42.561) 62.073,42.614 62.073,42.986 U9.W3@62.106,43.018
  Layer 4 w0.105: v1(50.444,34.21) 50.501,34.152 51.516,34.152 51.662,34.298 52.043,34.298 52.231,34.486 52.315,34.486 52.814,34.985 52.814,35.413 54.81,37.409 54.81,37.422 55.698,38.31 55.858,38.471 55.858,38.763 55.698,38.923 55.698,38.943 55.878,39.123 55.898,39.123 56.383,38.638 56.608,38.638 56.932,38.963 56.932,39.187 56.447,39.672 56.447,39.692 56.627,39.872 56.647,39.872 57.132,39.387 57.357,39.387 57.682,39.712 57.682,39.937 57.547,40.072 57.547,40.159 57.66,40.272 58.453,41.065 59.782,41.065 61.082,42.365 61.787,42.365 61.889,42.467 61.926,42.467 v1(62.02,42.561)
DDR_CH0_DQS1N_A: U8.AA4 U9.E10 | length 24.8
  Top Layer w0.112: v1(59.227,53.365) 59.252,53.389 59.607,53.389 U9.E10@59.631,53.413
  Layer 4 w0.105: v1(46.702,41.7) 46.76,41.758 46.896,41.758 47.519,42.381 47.519,43.534 48.441,44.456 48.441,49.126 56.222,56.907 56.775,56.907 57.588,56.093 58.325,55.357 59.111,54.57 59.227,54.454 v1(59.227,53.365)
DDR_CH0_DQS1N_B: U8.F4 U9.V10 | length 25
  Top Layer w0.112: U9.V10@65.606,47.438 65.651,47.438 65.757,47.543 v1(66.162,47.543)
  Layer 4 w0.105: v1(53.709,34.836) 53.709,35.231 53.923,35.446 54.058,35.446 54.378,35.126 54.66,35.126 54.776,35.126 54.837,35.187 54.837,35.318 54.978,35.459 55.411,35.459 55.552,35.318 55.552,34.835 55.566,34.821 55.821,34.821 55.835,34.835 55.835,35.318 55.976,35.459 56.409,35.459 56.55,35.318 56.55,35.187 56.611,35.126 56.954,35.126 57.728,35.126 58.742,36.14 59.233,36.14 59.533,36.44 60.223,37.131 60.498,37.131 60.776,36.852 60.814,36.852 61.156,37.194 61.156,37.232 60.877,37.51 60.877,37.785 61.926,38.833 62.789,39.696 62.882,39.696 ; 62.882,39.696 63.222,39.696 63.511,39.986 63.511,39.987 66.803,43.278 66.803,43.474 66.557,43.72 66.557,44.54 65.851,45.246 65.851,46.228 65.927,46.304 65.927,46.971 66.137,47.181 66.137,47.519 v1(66.162,47.543)
DDR_CH0_DQS1P_A: U8.AA5 U9.D10 | length 25.7
  Top Layer w0.112: v1(58.693,53.876) 58.695,53.874 59.169,53.874 U9.D10@59.171,53.872
  Layer 4 w0.105: v1@46.138,41.252 46.164,41.278 46.773,41.278 47.726,42.23 47.726,43.449 48.648,44.371 48.648,49.04 56.307,56.7 56.689,56.7 57.442,55.947 58.179,55.211 58.216,55.174 58.416,54.974 58.416,54.887 58.213,54.684 58.213,54.664 58.393,54.484 58.413,54.484 58.616,54.687 58.703,54.687 58.739,54.651 58.776,54.614 59.018,54.371 59.018,54.214 59.016,54.212 59.016,53.867 58.955,53.805 58.894,53.805 58.882,53.818 58.671,53.818 v1@58.666,53.823
  other v1: 46.256,41.161
DDR_CH0_DQS1P_B: U8.F5 U9.W10 | length 25.4
  Top Layer w0.112: U9.W10@66.065,46.978 66.097,47.01 66.616,47.01 v1(66.655,47.05)
  Layer 4 w0.105: v1(53.153,34.265) 53.246,34.265 53.449,34.467 53.869,34.467 54.312,34.91 54.66,34.91 54.865,34.91 55.053,35.098 55.053,35.229 55.067,35.243 55.322,35.243 55.336,35.229 55.336,34.745 55.477,34.605 55.91,34.605 56.051,34.745 56.051,35.229 56.065,35.243 56.319,35.243 56.334,35.229 56.334,35.098 56.522,34.91 56.954,34.91 57.83,34.91 58.833,35.913 59.327,35.913 59.693,36.28 60.317,36.904 60.404,36.904 60.683,36.625 60.908,36.625 61.382,37.1 61.382,37.325 61.104,37.604 61.104,37.691 62.086,38.673 62.883,39.469 63.139,39.469 ; 63.164,39.469 63.316,39.469 64.188,40.341 64.2,40.341 67.009,43.15 67.009,43.6 66.764,43.845 66.764,44.644 66.072,45.337 66.072,46.137 66.148,46.213 66.148,46.88 66.293,47.025 66.631,47.025 v1(66.655,47.05)
DDR_CH0_LP4/4X_CKE0_A: R87.1 U8.P7 | length 21.6
  Bottom Layer w0.156: v1(48.49,36.949) 48.523,36.949 49.075,37.501 49.279,37.501 49.865,38.087 50.105,38.087 53.061,41.043 53.061,41.467 52.052,42.477 52.052,42.647 52.214,42.81 52.387,42.81 53.301,41.895 53.504,41.895 53.65,42.041 53.65,42.171 52.806,43.015 52.806,43.145 52.974,43.312 53.179,43.312 53.774,42.718 53.965,42.718 56.59,45.343 56.944,45.343 57.175,45.575 57.175,45.704 56.985,45.894 56.985,46.024 57.095,46.133 57.224,46.133 57.414,45.943 57.544,45.943 57.654,46.054 57.654,46.211 57.553,46.312 ; 57.536,46.322 57.46,46.397 57.46,46.527 57.566,46.632 57.711,46.632 57.899,46.444 58.028,46.444 58.941,47.358 R87.1@58.958,47.358
DDR_CH0_LP4/4X_CKE0_B: R88.1 U8.L5 | length 20.5
  Bottom Layer w0.156: v1(50.927,36.796) 50.983,36.74 51.111,36.74 51.124,36.726 51.498,36.726 51.801,37.03 51.801,37.178 52.7,38.076 52.975,38.076 53.492,38.593 53.629,38.593 53.733,38.489 53.733,38.359 53.347,37.973 53.347,37.646 54.127,36.866 54.363,36.866 54.593,37.096 54.593,37.276 54.234,37.635 54.234,37.814 54.413,37.994 54.593,37.994 54.952,37.635 55.132,37.635 55.261,37.764 55.261,37.944 54.902,38.303 54.902,38.482 55.044,38.625 55.224,38.625 55.583,38.265 55.762,38.265 55.89,38.393 55.89,38.572 55.53,38.931 55.53,39.111 56.428,40.009 56.428,40.368 55.89,40.907 55.89,41.087 56.249,41.446 56.249,42.272 57.776,43.799 57.776,44.432 58.544,45.2 58.544,45.25 59.075,45.78 59.168,45.78 59.277,45.889 59.378,45.889 R88.1@59.413,45.854